# Altium PCB PCB1.pcbdoc
Units mil, origin at the board's own origin, x right, y up, seen from the top; angles counter-clockwise.
Board outline 2655 x 2075 mil, 2 copper layers (Top Layer, Bottom Layer); 12 components, 9 nets, 30 pads, 0 vias.
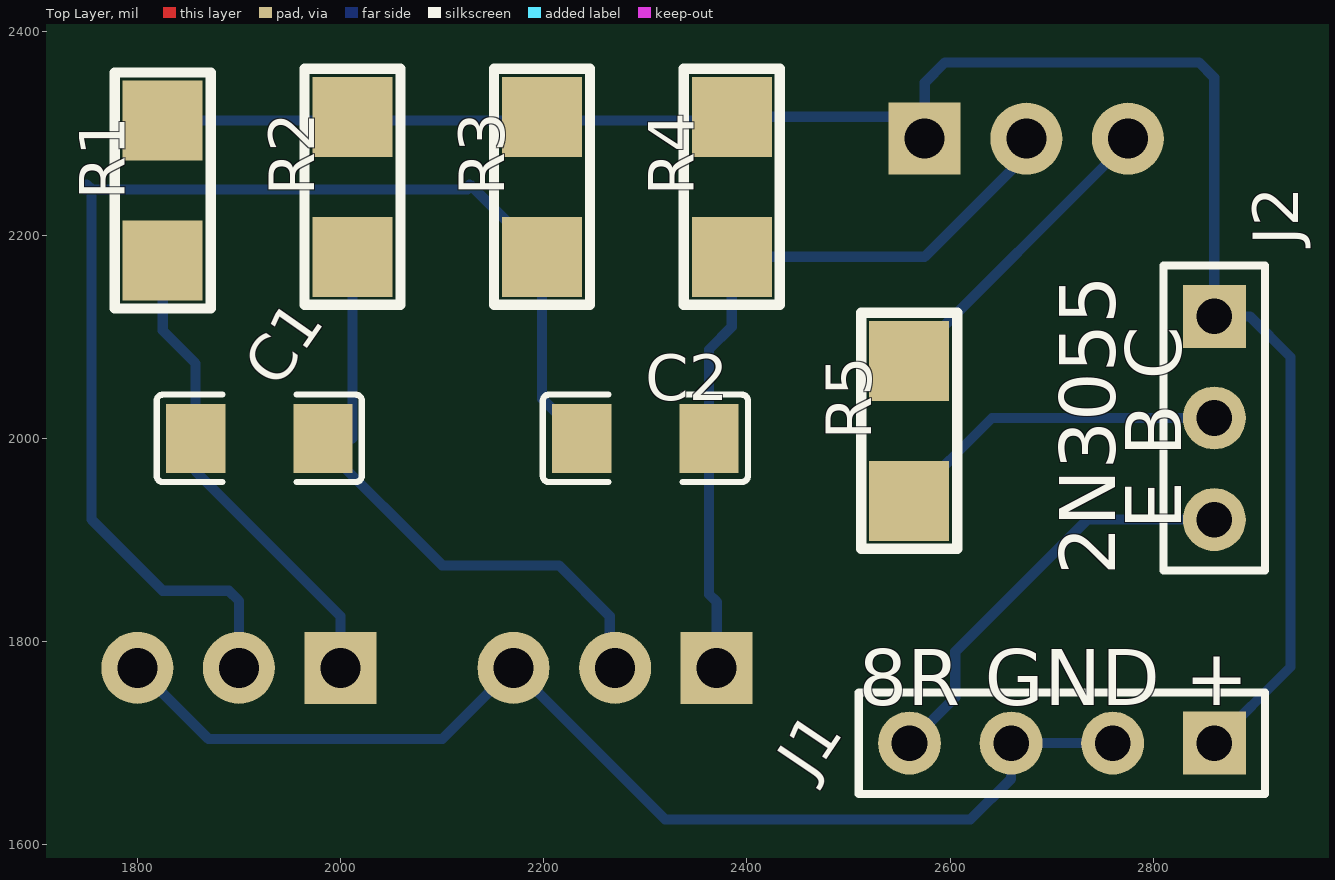
[diagram p0: Top Layer view]
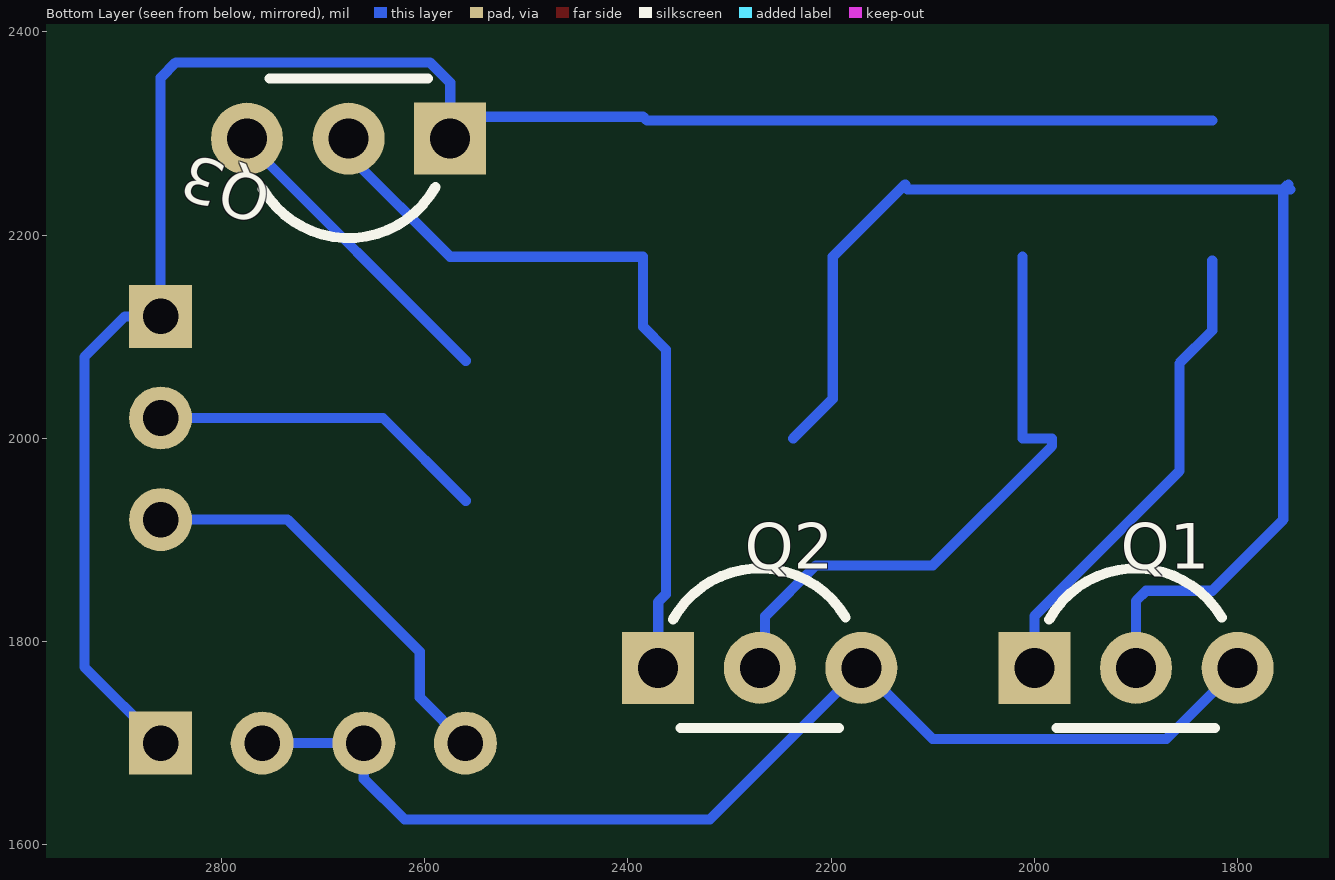
[diagram p1: Bottom Layer view, seen from below]

## Layer stack, top to bottom
Top Solder: solder mask 0.4, Solder Resist, Dk 3.5
Top Layer: signal copper 1.4
Dielectric1: dielectric 12.6, FR-4, Dk 4.8
Bottom Layer: signal copper 1.4
Bottom Solder: solder mask 0.4, Solder Resist, Dk 3.5

## Board outline
3655,1000 1000,1000 1000,3075 3655,3075

## Design rules (kind name [scope] priority, off if disabled: settings)
Clearance [All] p1: gap=10 ignorepadtopadclearanceinfootprint=FALSE
PolygonConnect [All] p1: connectstyle=Relief reliefconductorwidth=10 reliefentries=4 polygonreliefangle="90 Angle" airgapwidth=10
RoutingVias [All] p1: holewidth=28 width=50 viastyle="Through Hole" minholewidth=28 minwidth=50 maxholewidth=28 maxwidth=50
SolderMaskExpansion [All] p1: expansion=0 istentingtop=FALSE
Width [All] p1: maxlimit=10 minlimit=10 preferedwidth=10
30 further rules are at their usual default settings.

## Components (designator, comment, footprint, x,y, rotation, side; value= is the part's Value field where it differs from the comment)
C1 "330nF" C1206 1920,2000 r0 top
C2 "330nF" C1206 2300,2000 r0 top
J1 "POWER / OUT" HDR-M-2.54_1X4 2710,1700 r180 top
J2 "2N3055" HDR-M-2.54_1X3 2860,2020 r270 top
Q1 "BC548" TO-92-3_L4.8-W3.7-P2.54-L 1900,1774.05 r0 bottom
Q2 "BC548" TO-92-3_L4.8-W3.7-P2.54-L 2270.22,1774.05 r0 bottom
Q3 "BC548" TO-92-3_L4.8-W3.7-P2.54-L 2675,2295 r180 bottom
R1 "1K2" "RESISTOR SMD" 1825,2175 r90 top
R2 "56K" "RESISTOR SMD" 2011.7,2178.68 r90 top
R3 "56K" "RESISTOR SMD" 2198.4,2178.68 r90 top
R4 "1K2" "RESISTOR SMD" 2385.1,2178.68 r90 top
R5 "100R" "RESISTOR SMD" 2559.74,1938.56 r90 top

## Footprints (in the part's own frame and the unit in brackets; to place one, negate y for a bottom-side part, rotate by r counter-clockwise, add the part's x,y. Pads: shape width x height; smd on the part's side, far side on the other; paste and mask are expansions set on the pad)
C1206 [mm]
  rect 1.485x1.728 smd paste-100 mask+0.051: 1(-1.593,0) 2(1.593,0)
  silkscreen extent -2.56,-1.09 2.56,1.09
HDR-M-2.54_1X3 [mil]
  rect 62x62 hole 35 paste-99999 mask+2: 1(-100,0)
  round 62 hole 35 paste-99999 mask+2: 2(0,0) 3(100,0)
  silkscreen extent -150,-50 150,50
HDR-M-2.54_1X4 [mil]
  rect 62x62 hole 35 paste-99999 mask+2: 1(-150,0)
  round 62 hole 35 paste-99999 mask+2: 2(-50,0) 3(50,0) 4(150,0)
  silkscreen extent -200,-50 200,50
"RESISTOR SMD" [mm]
  rect 2x2 smd paste+0 mask+0.1: 01(0,0) 02(3.5,0)
  silkscreen extent -1.2,-1.2 4.7,1.2
TO-92-3_L4.8-W3.7-P2.54-L [mm]
  rect 1.8x1.8 hole 1 paste-2539.97 mask+0.051: 1(2.54,0)
  round 1.8 hole 1 paste-2539.97 mask+0.051: 2(0,0) 3(-2.54,0)
  silkscreen extent -2.14,-2.48 2.17,1.5

## Nets (pads, with @x,y where several pads share a name; then routed paths per layer and width w, separated by ;. In a path a pad name is that pad's centre, name@x,y a point inside that pad or via, vN(x,y) a via of type N, cw(c..) or ccw(c..) an arc to the next point about the centre after c; other vN are vias at no path point)
FET4OU8OHMS: J1.4 J2.3 | length 417.5
  Bottom Layer w10: J1.4 2605,1745 2605,1790 2735,1920 J2.3
GND: J1.2 J1.3 Q1.3 Q2.3 | length 1128.3
  Bottom Layer w10: Q1.3@1800,1774.05 1869.9,1704.15 2100.32,1704.15 Q2.3 ; Q2.3@2170.2,1774.1 2319.3,1625 2620,1625 2660,1665 J1.3 2750,1700 J1.2@2755,1705
J2_2: J2.2 R5.01 | length 334
  Bottom Layer w10: 2559.74,1938.56 2641.18,2020 J2.2
R1_01: C1.1 Q1.1 R1.01 | length 473.4
  Bottom Layer w10: 1825,2175 1825,2106.09 1857.3,2073.79 1857.3,2000 1857.3,1967.7 2000,1825 Q1.1@2000,1774.05
R2_01: C1.2 Q2.2 R2.01 | length 620.1
  Bottom Layer w10: 2011.7,2178.68 2011.7,2000 1982.7,2000 1982.7,1992.3 2100,1875 2215,1875 2265,1825 2265,1779.27 Q2.2
R3_01: C2.1 Q1.2 R3.01 | length 1248.9
  Bottom Layer w10: 1747.91,2245 2125,2245 ; 1750,2250 1755,2245 1755,1920 1825,1850 1890,1850 1900,1840 Q1.2@1900,1774.05 ; 2127.09,2250 2198.4,2178.68 2198.4,2038.9 2237.3,2000
R4_01: C2.2 Q2.1 Q3.2 R4.01 | length 764.6
  Bottom Layer w10: Q2.1 2370.22,1839.02 2362.7,1846.54 2362.7,2000 2362.7,2087.37 2385.1,2109.77 2385.1,2178.68 2574.92,2178.68 2675,2278.76 Q3.2
R5_02: Q3.3 R5.02 | length 307.8
  Bottom Layer w10: 2559.74,2076.36 2775,2291.62 Q3.3
VCC: J1.1 J2.1 Q3.1 R1.02 R2.02 R3.02 R4.02 | length 1852.6
  Bottom Layer w10: 1825,2312.8 2381.42,2312.8 2385.1,2316.48 2553.52,2316.48 Q3.1 2575,2350 2595,2370 2845,2370 2860,2355 J2.1 2895,2120 2935,2080 2935,1775 J1.1

## Silkscreen, mask and mechanical layers (free items; w line width, h text height)
Top Overlay:
  text "E B C" at 2827.56,1910 h55.12 r90
  text "2N3055" at 2762.56,1865 h55.12 r90
  text "8R GND +" at 2510,1737.44 h55.12